# Altium PCB PCB.PcbDoc (part 6 of 7)
Units mm, origin at the board's own origin, x right, y up, seen from the top; angles counter-clockwise.
Board outline 78.8 x 69 mm, 12 copper layers (Top Layer, GND_12, uStrip1, GND_35, Clocks, GND_57, POWER, Slow_Ctrl, GND_810, uStrip2, GND_1012, Bottom Layer), stack 2.926 mm thick; 290 components, 212 nets, 1379 pads, 3418 vias.
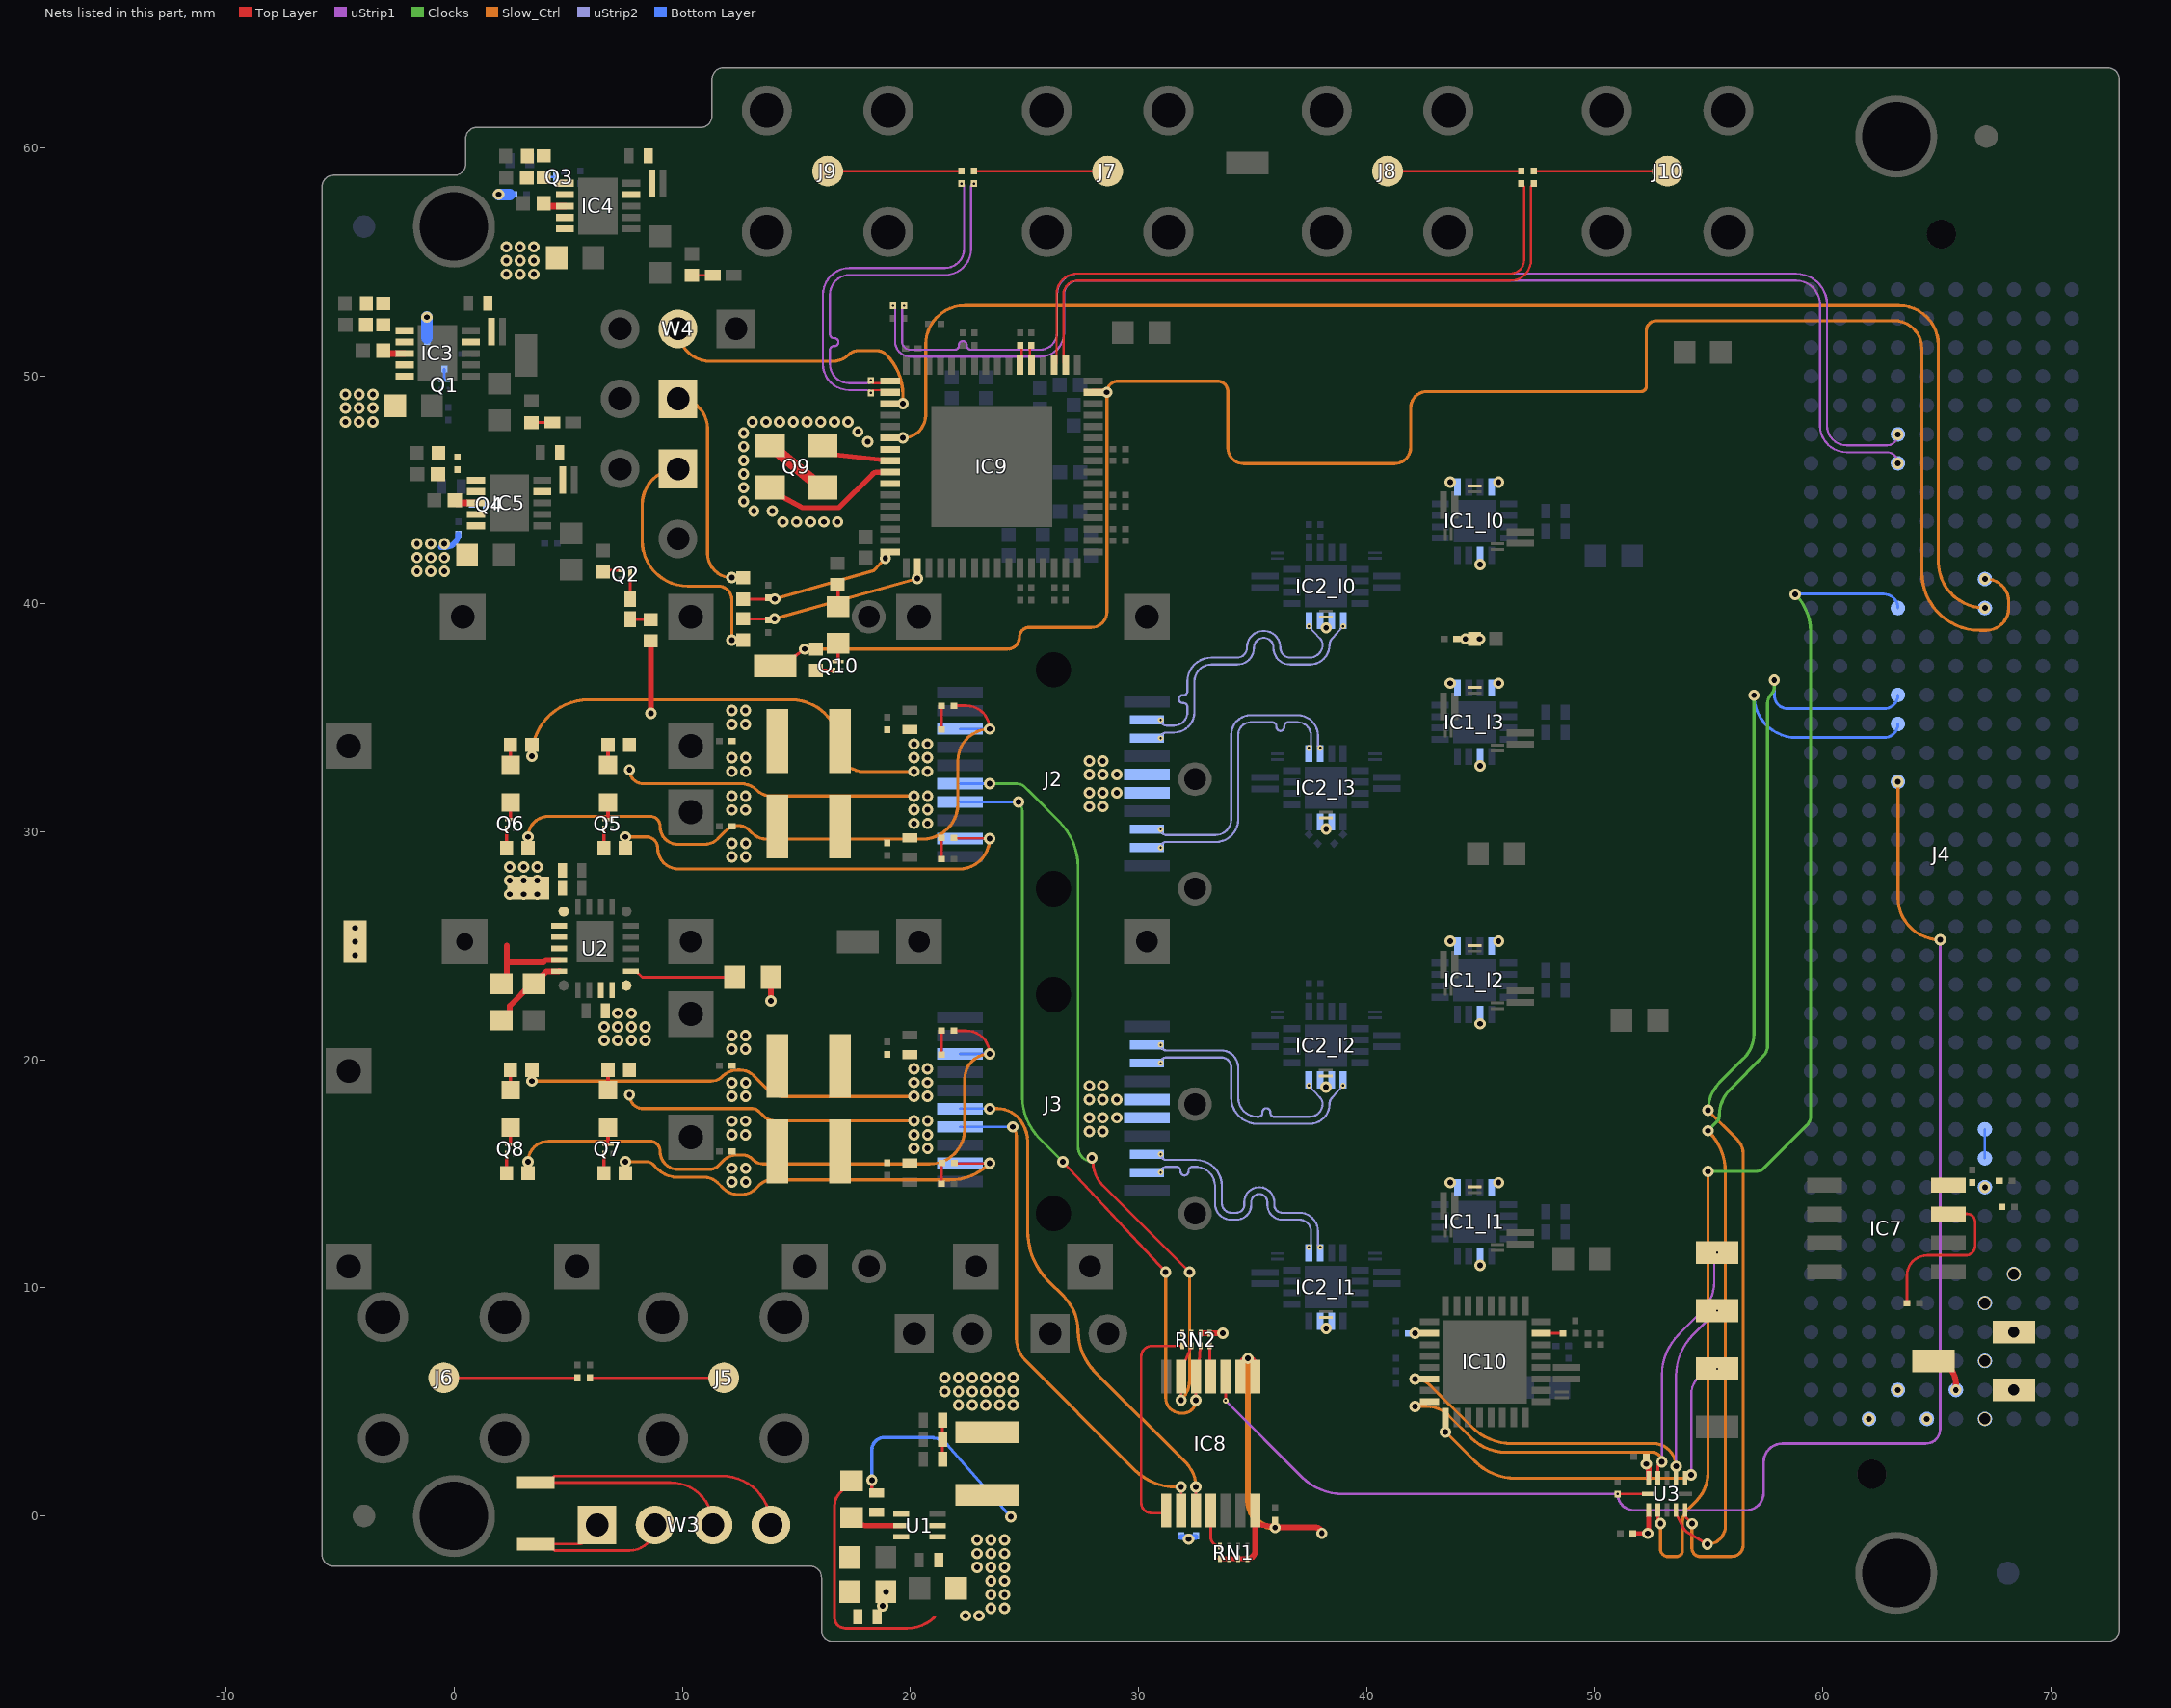
[diagram p15: the nets of this part, all layers, seen from the top]

## Via types
v1: diameter 0.25, hole 0.1, Top Layer to uStrip1, tented both sides, 895 vias
v2: diameter 0.25, hole 0.1, uStrip2 to Bottom Layer, tented both sides, 888 vias
v3: diameter 0.5, hole 0.25, Top Layer to Bottom Layer, tented both sides, 768 vias
v4: diameter 0.5, hole 0.25, Top Layer to Bottom Layer, 545 vias
v5: diameter 0.5, hole 0.25, uStrip1 to uStrip2, tented both sides, 315 vias
v6: diameter 0.584, hole 0.483, Top Layer to Bottom Layer, tented both sides, 6 vias
v7: diameter 0.5, hole 0.25, uStrip1 to uStrip2, 1 vias

## Nets (pads, with @x,y where several pads share a name; then routed paths per layer and width w, separated by ;. In a path a pad name is that pad's centre, name@x,y a point inside that pad or via, vN(x,y) a via of type N, cw(c..) or ccw(c..) an arc to the next point about the centre after c; other vN are vias at no path point) (continued)
IN1_N: C74.1 IC9.2 R50.1 | length 17.1
  Top Layer w0.099: v1(18.269,49.255) cw(c18.392,49.255) 18.392,49.378 19.011,49.378 cw(c19.011,49.28) IC9.2@19.108,49.28
  uStrip1 w0.094: v1(18.269,49.255) ccw(c18.146,49.255) 18.146,49.378 17.315,49.378 cw(c17.315,50.531) 16.162,50.531 16.162,53.561 cw(c17.337,53.561) 17.337,54.735 21.513,54.735 ccw(c21.513,55.578) 22.355,55.578 22.355,58.309 ccw(c22.232,58.309) v1(22.232,58.431)
IN1_P: C71.1 IC9.1 R50.2 | length 17.1
  Top Layer w0.099: v1(18.269,49.805) ccw(c18.392,49.805) 18.392,49.683 19.011,49.683 ccw(c19.011,49.78) IC9.1@19.108,49.78
  uStrip1 w0.094: v1(18.269,49.805) cw(c18.146,49.805) 18.146,49.683 17.315,49.683 cw(c17.315,50.531) 16.467,50.531 16.467,50.738 16.467,51.133 cw(c16.641,51.133) 16.641,51.307 16.669,51.307 ccw(c16.669,51.481) 16.669,51.655 16.641,51.655 cw(c16.641,51.829) 16.467,51.829 16.467,52.283 16.467,53.561 cw(c17.337,53.561) 17.337,54.431 21.513,54.431 ccw(c21.513,55.578) 22.66,55.578 22.66,58.309 cw(c22.782,58.309) v1(22.782,58.431)
LE_3V3: IC10.22 TP13.1 U3.8 | length 20.5
  uStrip1 w0.102: v3(53.569,2.175) 53.569,6.15 cw(c56.109,6.15) 54.313,7.946 v1(55.372,9.005)
  Slow_Ctrl w0.137: v3(42.131,6.013) cw(c42.131,5.118) 42.763,5.751 44.595,3.919 ccw(c46.391,5.715) 46.391,3.175 52.569,3.175 cw(c52.569,2.175) v3(53.569,2.175)
LE_PS: J4.G15 U3.4 | length 48.5
  Top Layer w0.127: U3.4@53.569,0.266 53.606,0.03 53.885,-0.524 ccw(c54.255,-0.338) 54.04,-0.693 v3(54.939,-1.237)
  Clocks w0.137: v3(54.969,16.896) 55.344,17.271 ccw(c55.05,17.565) 55.466,17.565 cw(c57.1,17.565) 55.945,18.72 57.394,20.169 ccw(c56.94,20.623) 57.582,20.623 57.582,35.639 ; 57.582,35.64 cw(c58.16,35.64) 57.751,36.049 ccw(c57.455,36.344) 57.873,36.344 v3(57.873,36.653)
  Slow_Ctrl w0.137: v3(54.939,-1.237) ccw(c54.939,-0.443) 55.734,-0.443 55.734,5.23 55.734,15.079 ccw(c53.194,15.079) 54.99,16.875 v3(54.969,16.896)
  Bottom Layer w0.127: v3(57.873,36.653) 57.873,36.008 ccw(c58.475,36.008) 58.475,35.407 62.694,35.407 ccw(c62.694,36.01) J4.G15@63.297,36.01
NetC12_l0_2: C12_l0.2 IC2_l0.2 IC2_l0.3
  other v3: 38.228,38.953
NetC12_l1_2: C12_l1.2 IC2_l1.2 IC2_l1.3
  other v3: 38.227,8.227
NetC12_l2_2: C12_l2.2 IC2_l2.2 IC2_l2.3
  other v3: 38.218,18.814
NetC12_l3_2: C12_l3.2 IC2_l3.2 IC2_l3.3
  other v3: 38.227,30.128
NetC17_2: C17.2 IC3.7 R5.2
NetC18_2: C18.2 C19.2 IC3.4
NetC20_2: C20.2 IC3.8 | length 1
  Top Layer w0.305: C20.2@-3.116,51.111 -2.958,50.987 IC3.8@-2.182,50.987
NetC22_1: C22.1 L1.1 U1.2 | length 9.9
  Top Layer w0.152: v3(18.309,1.576) 18.309,1.139 C22.1@18.507,1.015
  Bottom Layer w0.117: 21.598,3.131 v3(24.394,-0.034)
  Bottom Layer w0.152: v3(18.309,1.576) 18.309,2.898 cw(c18.853,2.898) 18.853,3.442 20.846,3.442 cw(c20.846,2.379) 21.595,3.134 21.598,3.131
NetC22_2: C22.2 U1.4
NetC29_1: C29.1 R9.2 R10.2 U1.6
NetC30_2: C30.2 IC4.7 R11.2
NetC31_2: C31.2 C32.2 IC4.4
NetC33_2: C33.2 IC4.8 | length 1
  Top Layer w0.305: C33.2@3.917,57.573 4.074,57.449 IC4.8@4.851,57.449
NetC39_2: C39.2 IC5.7 R17.2
NetC40_2: C40.2 C41.2 IC5.4
NetC42_2: C42.2 IC5.8 | length 1
  Top Layer w0.305: C42.2@0.024,44.556 0.182,44.432 IC5.8@0.958,44.432
NetC67_2: C67.2 J5.1 | length 5.9
  Top Layer w0.117: C67.2@5.951,6.062 J5.1@11.814,6.062
NetC68_2: C68.2 J6.1 | length 5.9
  Top Layer w0.117: J6.1@-0.461,6.062 C68.2@5.401,6.062
NetD1_2: D1.2 R3.1 | length 0.9
  Top Layer w0.117: R3.1@3.382,47.956 D1.2@4.303,47.956
NetD2_2: D2.2 R8.1 | length 0.9
  Top Layer w0.117: R8.1@10.415,54.418 D2.2@11.335,54.418
NetD3_1: D3.1 Q2.3 | length 1.1
  Top Layer w0.117: D3.1@7.713,40.224 Q2.3@7.713,41.298
NetD3_2: D3.2 R15.1 | length 0.9
  Top Layer w0.117: D3.2@7.713,39.324 R15.1@8.614,39.324
  Top Layer w0.254: R15.1@8.614,39.316 R15.1@8.614,39.324
NetD4_1: D4.1 Q10.3 | length 0.8
  Top Layer w0.152: Q10.3@16.821,37.481 D4.1@16.821,38.234
NetD4_2: D4.2 R57.1 | length 1
  Top Layer w0.152: R57.1@16.799,40.842 16.821,40.819 D4.2@16.821,39.878
NetIC3_6: IC3.6 R5.1 R6.2
NetIC4_6: IC4.6 R11.1 R12.2
NetIC5_6: IC5.6 R17.1 R19.2
NetIC6_1: IC6.1 W3.1 W3.2 | length 9.1
  Top Layer w0.117: W3.1@6.26,-0.392 cw(c5.421,-0.392) 5.421,-1.23 IC6.1@3.566,-1.23 4.333,-1.447 4.396,-1.511 7.681,-1.511 ccw(c7.681,-0.392) W3.2@8.8,-0.392
NetIC6_2: IC6.2 W3.3 W3.4 | length 20.4
  Top Layer w0.117: W3.3@11.34,-0.392 ccw(c9.478,-0.392) 9.478,1.47 IC6.2@3.566,1.47 4.333,1.686 4.396,1.75 11.738,1.75 cw(c11.738,-0.392) W3.4@13.88,-0.392
NetIC7_7: IC7.7 R46.2 | length 7.4
  Top Layer w0.117: R46.2@63.695,9.332 63.695,10.552 cw(c64.575,10.552) 64.575,11.431 66.265,11.431 ccw(c66.265,11.845) 66.679,11.845 66.679,12.9 ccw(c66.331,12.9) 66.331,13.248 IC7.7@65.503,13.248 ; R46.2@63.778,9.333 R46.2@63.781,9.333
NetIC8_4: IC8.4 RN2.8 | length 1.4
  Top Layer w0.117: RN2.8@33.117,7.458 33.12,7.371 33.12,6.783 IC8.4@33.167,6.109
NetIC8_8: IC8.8 RN2.5 | length 9.9
  Top Layer w0.117: IC8.8@31.217,0.233 31.055,0.126 30.586,0.126 cw(c30.586,0.598) 30.115,0.598 30.115,6.981 cw(c30.591,6.981) 30.591,7.457 31.893,7.457 RN2.5@31.917,7.458
NetIC8_11: IC8.11 RN1.4 | length 1.8
  Top Layer w0.117: IC8.11@33.167,0.233 33.167,-0.922 ccw(c33.567,-0.922) RN1.4@33.567,-1.323
NetIC9_3: IC9.3 W4.2 | length 12.5
  Slow_Ctrl w0.137: W4.2@9.808,52.063 ccw(c11.227,52.063) 11.227,50.644 16.58,50.644 ccw(c16.58,51.679) 17.312,50.947 cw(c17.703,50.556) 17.703,51.109 18.529,51.109 cw(c18.529,50.537) 18.934,50.941 cw(c17.163,49.171) 19.667,49.171 v3(19.667,48.78)
NetIC9_8: IC9.8 Q9.1 | length 3.1
  Top Layer w0.229: Q9.1@16.146,46.955 16.682,46.545 18.798,46.316 IC9.8@19.108,46.28
NetIC9_9: IC9.9 Q9.3 | length 6.1
  Top Layer w0.229: Q9.3@13.846,45.105 14.369,44.707 15.267,44.224 16.86,44.224 18.356,45.707 cw(c18.528,45.52) 18.528,45.774 18.81,45.774 IC9.9@19.108,45.78
NetIC9_16: IC9.16 R53.1 R55.2 | length 6.4
  Top Layer w0.127: R55.2@12.665,40.213 13.713,40.213 R53.1@13.768,40.268
  Slow_Ctrl w0.137: v3(14.052,40.218) 18.387,41.464 v3(18.899,42.005)
NetIC9_18: IC9.18 R54.1 R56.2 | length 7.6
  Top Layer w0.127: R56.2@12.665,39.353 13.712,39.353 R54.1@13.767,39.298
  Slow_Ctrl w0.137: v3(14.04,39.353) v3(20.308,41.122)
NetIC10_7: IC10.7 R61X.1 | length 0.9
  Top Layer w0.117: IC10.7@47.654,8.013 R61X.1@48.603,8.013
NetIC10_18: IC10.18 R62X.2
  other v3: 42.131,8.013
NetJ4_D30: J4.D30 J4.D31 | length 1.3
  Bottom Layer w0.117: J4.D31@67.107,15.69 J4.D30@67.107,16.96
NetLED1_1: LED1.1 Q5.3 | length 0.7
  Top Layer w0.152: Q5.3@6.74,30.547 LED1.1@6.74,31.29
NetLED1_2: LED1.2 R28.1 | length 0.9
  Top Layer w0.152: LED1.2@6.74,32.941 R28.1@6.74,33.819
NetLED2_1: LED2.1 Q6.3 | length 0.7
  Top Layer w0.152: 2.467,30.639 LED2.1@2.467,31.29
NetLED2_2: LED2.2 R29.1 | length 0.9
  Top Layer w0.152: LED2.2@2.467,32.941 R29.1@2.467,33.819
NetLED3_1: LED3.1 Q7.3 | length 0.7
  Top Layer w0.152: Q7.3@6.74,16.297 LED3.1@6.74,17.039
NetLED3_2: LED3.2 R36.1 | length 0.9
  Top Layer w0.152: LED3.2@6.74,18.69 R36.1@6.74,19.569
NetLED4_1: LED4.1 Q8.3 | length 0.7
  Top Layer w0.152: Q8.3@2.467,16.297 LED4.1@2.467,17.039
NetLED4_2: LED4.2 R37.1 | length 0.9
  Top Layer w0.152: LED4.2@2.467,18.69 R37.1@2.467,19.569
NetQ1_3: Q1.3 R2.1 | length 0.5
  Bottom Layer w0.117: Q1.3@-0.438,49.804 R2.1@-0.438,50.301
NetQ2_1: Q2.1 R18.2 | length 0.8
  Top Layer w0.117: R18.2@6.616,41.34 6.616,41.473 Q2.1@7.313,41.473
NetQ3_3: Q3.3 R22.1 | length 0.5
  Bottom Layer w0.117: R22.1@3.834,58.723 Q3.3@4.331,58.723
NetQ4_3: Q4.3 R26.1 | length 0.5
  Bottom Layer w0.117: R26.1@0.831,44.365 Q4.3@1.328,44.365
NetQ5_1: Q5.1 R33.2 | length 0.9
  Top Layer w0.152: R33.2@6.565,29.287 Q5.1@6.565,30.147
NetQ6_1: Q6.1 R34.2 | length 0.9
  Top Layer w0.152: R34.2@2.292,29.287 Q6.1@2.292,30.147
NetQ7_1: Q7.1 R41.2 | length 0.9
  Top Layer w0.152: R41.2@6.565,15.037 Q7.1@6.565,15.897
NetQ8_1: Q8.1 R42.2 | length 0.9
  Top Layer w0.152: R42.2@2.292,15.037 Q8.1@2.292,15.897
NetQ10_1: Q10.1 R58.2 | length 0.8
  Top Layer w0.152: R58.2@15.86,37.081 Q10.1@16.646,37.081
NetR7_1: R7.1 U1.5 | length 2.3
  Top Layer w0.229: R7.1@17.421,-0.064 17.615,-0.259 ccw(c18.004,0.13) 18.004,-0.419 U1.5@19.594,-0.419
NetR13_1: R13.1 U2.2 | length 4.6
  Top Layer w0.117: U2.2@7.747,23.89 7.972,23.89 8.24,23.622 R13.1@12.281,23.622
NetR14_1: R14.1 R16.2 U2.17 | length 3.6
  Top Layer w0.254: R14.1@2.056,21.742 2.106,21.742 2.429,22.065 2.429,22.373 3.397,23.342 3.447,23.342 R16.2@3.497,23.342 4.044,23.888 4.595,23.888 U2.17@4.597,23.89
NetR55_1: R55.1 W5.1 | length 9.2
  Slow_Ctrl w0.137: W5.1@9.808,48.994 cw(c9.808,47.697) 11.105,47.697 11.105,42.215 ccw(c12.167,42.215) v3(12.167,41.153)
NetR56_1: R56.1 W6.1 | length 11.2
  Slow_Ctrl w0.137: W6.1@9.808,45.925 ccw(c9.808,44.355) 8.238,44.355 8.238,42.778 ccw(c10.233,42.778) 10.233,40.783 11.575,40.783 cw(c11.572,40.188) 12.167,40.188 v3(12.167,38.413)
OE_LS: IC8.3 J4.G18 R47.2 U3.12 | length 67.8
  Top Layer w0.117: v1(33.817,5.062) IC8.3@33.817,6.109 ; v1(51.009,0.966) U3.12@52.369,0.966
  uStrip1 w0.117: v1(33.817,5.062) 37.168,1.71 ccw(c38.965,3.506) 38.965,0.966 v1(51.009,0.966) ccw(c51.721,0.966) 51.721,0.254 56.642,0.254 ccw(c56.642,1.016) 57.404,1.016 57.404,2.349 cw(c58.229,2.349) 58.229,3.175 64.516,3.175 ccw(c64.516,3.81) 65.151,3.81 v7(65.151,25.273)
  Slow_Ctrl w0.137: v4(63.298,32.2) 63.298,27.126 ccw(c65.151,27.126) v7(65.151,25.273)
P2V05: C34.2 C35.2 C37.2 IC5.9 IC5.10 R14.2 R25.1 TP4.1 U2.12 U2.13 U2.14 U2.15 U2.16 | length 5.2
  Top Layer w0.254: R14.2@2.056,23.342 2.295,23.581 2.295,24.274 ; 2.295,25.017 2.295,24.274 ; U2.16@4.597,24.39 4.595,24.388 4.013,24.388 3.899,24.274 2.295,24.274
  Bottom Layer w0.254: v4@-0.591,42.496 -0.389,42.496 ccw(c-0.389,43.055) R25.1@0.171,43.055
  other v4: 2.438,27.269 3.038,27.269 3.638,27.269 2.438,27.869 3.038,27.869 3.638,27.869 2.438,28.469 3.038,28.469 3.638,28.469 -1.634,41.434 -1.034,41.434 -0.434,41.434 -1.634,42.034 -1.034,42.034 -0.434,42.034 -1.634,42.634 -1.034,42.634 -0.434,42.634
P3V3: C36.2 C47.2 C50.2 C53.2 C56.2 C107.2 J4.C39 J4.D36 J4.D38 J4.D40 L2.2 L3.2 L4.2 L5.2 R13.2 R15.2 R48.1 R49.1 RN2.1 RN2.2 RN2.3 RN2.4 TP7.1 U2.1 U2.21 U2.22 U3.11 | length 6.5
  Top Layer w0.254: R15.2@8.614,38.376 8.618,38.372 8.618,35.206 v3(8.622,35.202) ; v4(13.881,22.591) R13.2@13.881,23.622 ; RN2.2@32.717,8.008 RN2.1@33.117,8.008 v4(33.7,8.008) ; v3(52.269,2.28) cw(c52.269,2.18) 52.369,2.18 U3.11@52.369,1.666
  Bottom Layer w0.254: R48.1@31.867,-0.922 R49.1@32.517,-0.922
  other v3: 32.193,-1.017
  other v4: 12.174,14.65 12.774,14.65 12.174,15.25 12.774,15.25 12.169,16.718 12.769,16.718 12.169,17.318 12.769,17.318 12.174,18.404 12.774,18.404 12.174,19.004 12.774,19.004 12.169,20.472 12.769,20.472 6.566,20.851 7.166,20.851 7.766,20.851 8.366,20.851 12.169,21.072 12.769,21.072 6.566,21.451 7.166,21.451 7.766,21.451 8.366,21.451 7.166,22.051 7.766,22.051 12.174,28.9 12.774,28.9 12.174,29.5 12.774,29.5 12.169,30.968 12.769,30.968 12.169,31.568 12.769,31.568 12.174,32.654 12.774,32.654 12.174,33.254 12.774,33.254 12.169,34.722 12.769,34.722 12.169,35.322 12.769,35.322
  other v6: 67.108,4.26 68.378,5.53 67.108,6.8 67.108,9.34
P3V3A: C65.2 IC7.8 J4.D32 R44.2 R45.2 | length 0
  Top Layer w0.117: R44.2@66.552,14.626 R44.2@66.552,14.632
  other v3: 67.108,14.42
P3V6: C15.2 C23.1 C24.2 C25.2 C27.2 C29.2 IC3.9 IC3.10 IC4.9 IC4.10 L1.2 R1.1 R9.1 R21.1 TP2.1 | length 3.1
  Top Layer w0.127: C23.1@21.41,2.489 C24.2@21.41,3.343 C25.2@21.41,4.197
  Bottom Layer w0.508: -1.198,51.661 v3(-1.198,52.578) ; v3(1.945,57.963) 2.429,57.963
  other v4: 18.788,-3.941 18.922,-3.326 22.108,4.865 22.708,4.865 23.308,4.865 23.908,4.865 24.508,4.865 21.508,5.465 22.108,5.465 22.708,5.465 23.308,5.465 23.908,5.465 24.508,5.465 21.508,6.065 22.108,6.065 22.708,6.065 23.308,6.065 23.908,6.065 24.508,6.065 -4.349,24.59 -4.349,25.19 -4.349,25.79 -4.774,47.989 -4.174,47.989 -3.574,47.989 -4.774,48.589 -4.174,48.589 -3.574,48.589 -4.774,49.189 -4.174,49.189 -3.574,49.189 2.285,54.46 2.885,54.46 3.485,54.46 2.285,55.06 2.885,55.06 3.485,55.06 2.285,55.66 2.885,55.66 3.485,55.66
P12V: C21.1 C26.2 J4.C35 J4.C37 R7.2 TP6.1 U1.1 | length 11.1
  Top Layer w0.127: 16.671,-2.463 16.671,-4.485 ccw(c17.139,-4.46) 17.139,-4.929 19.861,-4.929 ccw(c19.861,-3.239) 21.056,-4.434 ; 16.671,-2.463 16.671,0.459 cw(c17.459,0.459) 16.902,1.016 R7.2@17.421,1.536
  other v4: 22.411,-4.376 23.011,-4.376 23.524,-4.049 24.124,-4.049 23.524,-3.449 24.124,-3.449 23.524,-2.849 24.124,-2.849 22.924,-2.249 23.524,-2.249 24.124,-2.249 22.924,-1.649 23.524,-1.649 24.124,-1.649 22.924,-1.049 23.524,-1.049 24.124,-1.049
  other v6: 68.378,8.07 68.378,10.61
PLL_IN_AUX_N: C74.2 J9.1 | length 5.9
  Top Layer w0.117: J9.1@16.37,58.981 C74.2@22.232,58.981
PLL_IN_AUX_P: C71.2 J7.1 | length 5.9
  Top Layer w0.117: C71.2@22.782,58.981 J7.1@28.645,58.981
PLL_Lock: IC9.47 J4.D11 R58.1 TP9.1 | length 88.6
  Top Layer w0.137: TP9.1@14.073,37.285 14.929,37.716 v3(15.362,38.021)
  Top Layer w0.3: IC9.47@28.008,49.28 v3(28.613,49.28)
  Slow_Ctrl w0.137: v3(15.362,38.021) 24.258,38.021 ccw(c24.258,38.539) 24.776,38.539 cw(c25.213,38.539) 25.213,38.976 27.934,38.976 ccw(c27.934,39.655) 28.613,39.655 v3(28.613,49.28) cw(c29.102,49.28) 29.102,49.77 33.46,49.77 cw(c33.46,49.31) 33.919,49.31 33.919,46.842 ccw(c34.604,46.842) 34.604,46.158 41.224,46.158 ccw(c41.224,46.868) 41.935,46.868 41.935,48.598 cw(c42.654,48.598) 42.654,49.317 52.041,49.317 ccw(c52.041,49.545) 52.269,49.545 52.269,51.99 cw(c52.701,51.99) 52.701,52.422 63.131,52.422 cw(c63.131,51.208) 64.344,51.208 64.344,41.386 ccw(c66.884,41.386) 66.884,38.846 67.177,38.846 ccw(c67.177,39.823) 68.153,39.823 68.153,40.102 ccw(c67.165,40.102) 67.165,41.09 v3(67.108,41.09)
PLL_OUT_N: C70.1 IC9.53 | length 1
  Top Layer w0.099: IC9.53@25.308,50.48 cw(c25.308,50.553) 25.236,50.553 25.236,51.276 cw(c25.308,51.276) C70.1@25.308,51.348
PLL_OUT_P: C69.1 IC9.54 | length 1
  Top Layer w0.099: IC9.54@24.808,50.48 ccw(c24.808,50.553) 24.881,50.553 24.881,51.276 ccw(c24.809,51.276) C69.1@24.809,51.348
PLL_OUTA_N: C76.1 IC9.50 | length 27.7
  Top Layer w0.099: IC9.50@26.736,50.553 26.711,50.578 26.711,53.584 cw(c27.308,53.584) 27.308,54.181 46.308,54.181 ccw(c46.308,55.083) 47.21,55.083 47.21,58.309 C76.1@47.234,58.333
PLL_OUTA_P: C73.1 IC9.51 | length 27.7
  Top Layer w0.099: IC9.51@26.381,50.553 26.406,50.578 26.406,53.584 cw(c27.308,53.584) 27.308,54.486 46.308,54.486 ccw(c46.308,55.083) 46.905,55.083 46.905,58.309 C73.1@46.88,58.333
PLL_RSTb: IC9.6 J4.D12 | length 63.7
  Slow_Ctrl w0.137: v3(19.667,47.28) ccw(c19.667,48.282) 20.668,48.282 20.668,51.379 cw(c22.374,51.379) 22.374,53.084 63.347,53.084 cw(c63.347,51.361) 65.07,51.361 65.07,41.858 ccw(c67.108,41.858) v3(67.108,39.82)
PLL_SMA_OUT_N: C76.2 J10.1 | length 5.9
  Top Layer w0.117: C76.2@47.332,58.981 J10.1@53.195,58.981
PLL_SMA_OUT_P: C73.2 J8.1 | length 5.9
  Top Layer w0.117: J8.1@40.92,58.981 C73.2@46.782,58.981
RXUSRCLK_N: C79.2 J4.G7 | length 55.4
  uStrip1 w0.094: v1(19.233,53.072) cw(c19.233,52.978) 19.328,52.978 19.328,51.513 ccw(c19.996,51.513) 19.996,50.845 25.685,50.845 ccw(c25.685,51.893) 26.733,51.893 26.733,53.563 cw(c27.351,53.563) 27.351,54.181 58.836,54.181 cw(c58.836,53.136) 59.881,53.136 59.881,47.824 ccw(c61.053,47.824) 61.053,46.653 62.815,46.653 cw(c62.815,46.17) v2(63.298,46.17)
  other v5: 63.298,46.17
RXUSRCLK_P: C77.2 J4.G6 | length 55.4
  uStrip1 w0.094: v1(19.727,53.075) ccw(c19.727,52.98) 19.633,52.98 19.633,51.513 ccw(c19.996,51.513) 19.996,51.15 21.551,51.15 21.951,51.15 ccw(c21.951,51.324) 22.125,51.324 22.125,51.354 cw(c22.298,51.354) 22.472,51.354 22.472,51.324 ccw(c22.646,51.324) 22.646,51.15 23.041,51.15 25.685,51.15 ccw(c25.685,51.893) 26.429,51.893 26.429,53.563 cw(c27.351,53.563) 27.351,54.485 58.836,54.485 cw(c58.836,53.136) 60.186,53.136 60.186,47.824 ccw(c61.053,47.824) 61.053,46.957 62.815,46.957 ccw(c62.815,47.44) v5(63.298,47.44)
  other v2: 63.298,47.44
S_IN_PS: J4.G12 U3.2 | length 53.8
  Top Layer w0.117: U3.2@52.733,0.03 U3.2@52.769,0.266 52.769,-0.218 ccw(c52.886,-0.218) v3(52.886,-0.335)
  Clocks w0.137: v3(54.969,15.11) 54.971,15.112 57.066,15.112 ccw(c57.066,15.622) 57.427,15.261 59.309,17.143 ccw(c58.913,17.539) 59.473,17.539 59.473,38.787 ccw(c57.161,38.787) v3(58.796,40.422)
  Slow_Ctrl w0.137: v3(52.886,-0.335) 52.886,-1.451 ccw(c53.213,-1.451) 53.213,-1.778 53.594,-1.778 ccw(c53.594,-1.524) 53.848,-1.524 53.848,-0.401 ccw(c53.711,-0.401) 53.847,-0.385 cw(c54.265,-0.338) 53.846,-0.305 53.848,-0.279 ccw(c53.711,-0.268) 53.848,-0.268 cw(c54.621,-0.268) 54.074,0.278 54.447,0.65 ccw(c53.185,1.912) 54.969,1.912 54.969,2.09 cw(c55.106,2.089) 54.969,2.095 ccw(c53.511,2.159) 54.971,2.159 54.971,2.308 ccw(c53.87,2.308) 54.969,2.363 cw(c55.106,2.369) 54.969,2.368 v3(54.969,15.11)
  Bottom Layer w0.127: v3(58.796,40.422) 58.805,40.431 62.686,40.431 cw(c62.686,39.82) J4.G12@63.297,39.82
SCL0: IC8.6 J2.5 RN2.6 | length 35.3
  Top Layer w0.117: v4@28.003,15.537 ccw(c29.459,15.537) 28.429,14.508 v3(32.239,10.698) ; v3(31.867,5.073) IC8.6@31.867,6.109 32.028,6.783 32.293,7.371 RN2.6@32.317,7.458
  Clocks w0.117: v3(23.471,32.115) 24.319,32.115 24.667,32.115 cw(c24.667,31.625) 25.013,31.972 25.259,31.726 26.515,30.47 cw(c24.495,28.457) 27.346,28.457 27.346,16.193 ccw(c28.003,16.193) v4@28.003,15.537
  Slow_Ctrl w0.137: v3(31.867,5.073) ccw(c30.968,5.972) 32.239,5.972 v3(32.239,10.698)
  Bottom Layer w0.117: J2.5@22.171,32.115 v3(23.471,32.115)
  other v4: 27.958,15.707
SCL1: IC8.10 J3.5 R49.2 | length 24.2
  Top Layer w0.137: IC8.10@32.517,0.233 v3(32.517,1.269)
  Slow_Ctrl w0.137: v3(23.471,17.865) 23.816,17.865 cw(c23.816,16.628) 24.691,17.503 cw(c23.613,16.424) 25.138,16.424 25.138,12.462 25.148,12.296 ccw(c28.227,12.484) 26.046,10.303 ; 26.046,10.302 26.727,9.621 cw(c25.216,8.111) 27.352,8.111 ccw(c29.892,8.111) 28.096,6.315 32.074,2.337 cw(c31.006,1.269) v3(32.517,1.269)
  Bottom Layer w0.117: J3.5@22.171,17.865 v3(23.471,17.865)
  Bottom Layer w0.137: R49.2@32.517,-0.317 v3(32.517,1.269)
SDA0: IC8.5 J2.4 RN2.7 | length 35.6
  Top Layer w0.117: v3(26.683,15.537) v3(31.19,10.702) ; v3(32.517,5.073) IC8.5@32.517,6.109 32.666,6.77 32.706,7.384 RN2.7@32.717,7.458
  Clocks w0.117: v3(24.741,31.315) cw(c24.341,30.915) 24.907,30.915 24.907,18.365 ccw(c27.447,18.365) 25.651,16.569 v3(26.683,15.537)
  Slow_Ctrl w0.137: v3(31.19,10.702) 31.19,5.189 ccw(c31.867,5.189) 31.867,4.512 31.957,4.512 ccw(c31.957,5.073) v3(32.517,5.073)
  Bottom Layer w0.117: J2.4@22.171,31.315 v3(24.741,31.315)
SDA1: IC8.9 J3.4 R48.2 | length 24.3
  Top Layer w0.117: IC8.9@31.867,0.233 v3(31.867,1.269)
  Slow_Ctrl w0.137: v3(24.487,17.065) cw(c24.112,16.689) 24.643,16.689 24.643,7.804 ccw(c26.071,7.804) 25.061,6.794 29.616,2.239 29.843,2.013 ccw(c31.639,3.809) 31.639,1.269 v3(31.867,1.269)
  Bottom Layer w0.117: J3.4@22.171,17.065 v3(24.487,17.065) ; R48.2@31.867,-0.317 v3(31.867,1.269)
SDO2_3V3: IC10.25 TP10.1 U3.7 | length 16.9
  uStrip1 w0.102: v3(54.234,1.803) 54.234,5.315 cw(c55.372,5.315) v1(55.372,6.453)
  Slow_Ctrl w0.137: v3(43.454,3.689) 44.749,2.395 ccw(c46.545,4.191) 46.545,1.651 53.868,1.651 ccw(c53.868,2.168) v3(54.234,1.803)
SDO_PS: J4.G16 U3.5 | length 50.8
  Top Layer w0.117: U3.5@53.969,0.266 54.011,0.025 54.011,-0.084 v3(54.265,-0.338)
  Clocks w0.137: v3(54.969,17.789) cw(c56.684,17.789) 55.471,19.001 56.528,20.058 ccw(c55.42,21.166) 56.987,21.166 v3(56.987,35.993)
  Slow_Ctrl w0.137: v3(54.265,-0.338) 54.265,-1.415 ccw(c54.627,-1.415) 54.627,-1.778 56.007,-1.778 ccw(c56.007,-1.277) 56.508,-1.277 56.508,15.879 ccw(c55.614,15.879) 56.246,16.511 v3(54.969,17.789)
  Bottom Layer w0.127: v3(56.987,35.993) ccw(c58.841,35.993) 58.841,34.139 62.697,34.139 ccw(c62.697,34.74) J4.G16@63.297,34.74
SFP0_FAULT: J2.2 R31.1 R33.1 | length 20.4
  Top Layer w0.117: R31.1@21.959,29.738 ccw(c21.982,29.738) 21.982,29.715 v3(23.471,29.715)
  Slow_Ctrl w0.137: v3(7.505,29.785) 8.431,29.785 cw(c8.431,29.302) 8.914,29.302 ccw(c9.841,29.302) 9.841,28.375 22.131,28.375 ccw(c22.131,29.715) v3(23.471,29.715)
  Bottom Layer w0.117: J2.2@22.171,29.715 v3(23.471,29.715)
SFP0_LOS: J2.8 R32.1 R34.1 | length 28.9
  Top Layer w0.117: R32.1@21.904,35.535 22.452,35.535 cw(c22.452,34.515) v3(23.471,34.515)
  Slow_Ctrl w0.137: v3(3.232,29.785) cw(c4.131,29.785) 4.131,30.684 8.582,30.684 cw(c8.582,30.24) 9.025,30.24 ccw(c9.813,30.24) 9.813,29.452 10.95,29.452 ccw(c10.95,30.304) 11.552,29.702 11.892,30.042 cw(c12.457,29.478) 12.457,30.276 cw(c12.457,29.612) 12.926,30.081 13.053,29.955 ccw(c13.695,30.597) 13.695,29.688 20.54,29.688 ccw(c20.54,31.228) 22.079,31.228 22.079,33.119 cw(c23.475,33.119) v3@23.475,34.515
  Bottom Layer w0.117: J2.8@22.171,34.515 v3(23.471,34.515)
SFP1_FAULT: J3.2 R39.1 R41.1 | length 19.6
  Top Layer w0.117: R39.1@21.959,15.488 ccw(c21.982,15.488) 21.982,15.465 v3(23.471,15.465)
  Slow_Ctrl w0.137: v3(7.505,15.535) 8.431,15.535 cw(c8.431,15.138) 8.712,15.418 8.912,15.218 ccw(c9.779,16.085) 9.779,14.859 10.944,14.859 cw(c10.944,13.992) 11.557,14.605 11.796,14.366 ccw(c12.446,15.017) 12.446,14.097 12.595,14.097 ccw(c12.595,14.964) 13.208,14.351 13.357,14.5 cw(c13.937,13.919) 13.937,14.74 21.721,14.74 ccw(c21.721,17.215) v3(23.471,15.465)
  Bottom Layer w0.117: J3.2@22.171,15.465 v3(23.471,15.465)
SFP1_LOS: J3.8 R40.1 R42.1 | length 28.9
  Top Layer w0.117: R40.1@21.904,21.285 22.452,21.285 cw(c22.452,20.265) v3(23.471,20.265)
  Slow_Ctrl w0.137: v3(3.232,15.535) cw(c4.131,15.535) 4.131,16.434 8.582,16.434 cw(c8.582,15.99) 9.025,15.99 ccw(c9.813,15.99) 9.813,15.202 11.175,15.202 ccw(c11.175,15.789) 11.59,15.374 11.841,15.625 ; 11.841,15.625 cw(c12.326,15.139) 12.326,15.826 12.676,15.826 cw(c12.676,15.309) 13.041,15.675 13.093,15.622 ccw(c13.537,16.066) 13.537,15.438 20.84,15.438 ccw(c20.84,16.978) 22.379,16.978 22.379,19.173 cw(c23.471,19.173) v3(23.471,20.265)
  Bottom Layer w0.117: J3.8@22.171,20.265 v3(23.471,20.265)
SFP_RX0_N: IC2_l0.4 J2.12 | length 12.7
  uStrip2 w0.094: v2(30.972,34.915) ccw(c31.22,34.915) 31.22,34.667 31.557,34.667 ccw(c31.557,35.257) 32.146,35.257 32.146,35.431 32.146,35.478 ccw(c31.972,35.478) 31.972,35.652 31.945,35.652 cw(c31.945,35.826) 31.945,36 31.972,36 ccw(c31.972,36.174) 32.146,36.174 32.146,36.551 32.146,36.604 cw(c33.191,36.604) 33.191,37.649 34.127,37.649 34.326,37.649 ccw(c34.326,38.077) 34.754,38.077 34.754,38.088 cw(c35.487,38.088) 36.22,38.088 36.22,38.077 ccw(c36.648,38.077) 36.648,37.649 37.502,37.649 ccw(c37.502,38.218) 38.071,38.218 ccw(c37.683,38.218) 37.957,38.492 v2(37.469,39.019)
SFP_RX0_P: IC2_l0.1 J2.13 | length 12.7
  uStrip2 w0.094: v2(30.972,34.115) cw(c31.22,34.115) 31.22,34.363 31.557,34.363 ccw(c31.557,35.257) 32.451,35.257 32.451,36.604 cw(c33.191,36.604) 33.191,37.344 34.127,37.344 34.326,37.344 ccw(c34.326,38.077) 35.059,38.077 35.059,38.088 cw(c35.487,38.088) 35.915,38.088 35.915,38.077 ccw(c36.648,38.077) 36.648,37.344 37.502,37.344 37.516,37.344 ccw(c37.516,38.204) 38.375,38.204 cw(c38.778,38.204) 38.493,38.489 38.497,38.492 v2(38.969,39.019)
SFP_RX1_N: IC2_l2.4 J3.12 | length 11.3
  uStrip2 w0.094: v2(30.972,20.665) ccw(c31.22,20.665) 31.22,20.417 33.623,20.417 cw(c33.623,19.669) 34.372,19.669 34.372,18.348 ccw(c35.211,18.348) 35.211,17.508 35.258,17.508 ccw(c35.258,17.682) 35.432,17.682 35.432,17.709 cw(c35.606,17.709) 35.78,17.709 35.78,17.682 ccw(c35.954,17.682) 35.954,17.508 37.265,17.508 37.5,17.508 ccw(c37.5,18.078) 38.069,18.078 ccw(c37.681,18.078) 37.956,18.352 v2(37.468,18.878)
SFP_RX1_P: IC2_l2.1 J3.13 | length 11.3
  uStrip2 w0.094: v2(30.972,19.865) cw(c31.22,19.865) 31.22,20.113 33.623,20.113 cw(c33.623,19.669) 34.067,19.669 34.067,18.348 ccw(c35.211,18.348) 35.211,17.204 37.513,17.204 ccw(c37.513,18.064) 38.374,18.064 cw(c38.777,18.064) 38.492,18.349 38.495,18.352 v2(38.968,18.878)
SFP_TX0_N: IC2_l3.9 J2.19 | length 12.7
  uStrip2 w0.094: v2(30.972,29.315) cw(c31.22,29.315) 31.22,29.563 33.379,29.563 ccw(c33.379,30.555) 34.372,30.555 34.372,34.275 cw(c34.907,34.275) 34.907,34.81 35.476,34.81 35.871,34.81 cw(c35.871,34.636) 36.045,34.636 36.045,34.608 ccw(c36.219,34.608) 36.393,34.608 36.393,34.636 cw(c36.567,34.636) 36.567,34.81 36.948,34.81 36.976,34.81 ; 36.977,34.81 cw(c36.976,34.221) 37.565,34.221 37.565,33.785 cw(c37.468,33.785) v2(37.468,33.687)
SFP_TX0_P: IC2_l3.10 J2.18 | length 12.7
  uStrip2 w0.094: v2(30.972,30.115) ccw(c31.22,30.115) 31.22,29.867 33.379,29.867 ccw(c33.379,30.555) 34.067,30.555 34.067,34.275 cw(c34.907,34.275) 34.907,35.115 36.976,35.115 cw(c36.976,34.221) 37.87,34.221 37.87,33.785 ccw(c37.968,33.785) v2(37.968,33.687)
SFP_TX1_N: IC2_l1.9 J3.19 | length 11.3
  uStrip2 w0.094: v2(30.972,15.065) cw(c31.22,15.065) 31.22,15.313 31.273,15.313 31.668,15.313 cw(c31.668,15.139) 31.842,15.139 31.842,15.111 ccw(c32.016,15.111) 32.19,15.111 32.19,15.139 cw(c32.364,15.139) 32.364,15.313 32.508,15.313 32.549,15.312 cw(c32.508,14.469) 32.593,15.308 cw(c32.508,14.469) 32.596,15.308 cw(c32.508,14.469) 32.598,15.308 cw(c32.508,14.469) 33.352,14.469 33.352,13.71 ccw(c34.067,13.71) 34.067,12.995 34.087,12.995 34.286,12.995 ccw(c34.286,13.652) 34.943,13.652 34.943,13.763 cw(c35.295,13.763) 35.647,13.763 35.647,13.652 ccw(c36.303,13.652) 36.303,12.995 37.016,12.995 37.051,12.995 cw(c37.051,12.481) 37.565,12.481 37.565,11.884 cw(c37.468,11.884) v2(37.468,11.786)
SFP_TX1_P: IC2_l1.10 J3.18 | length 11.3
  uStrip2 w0.094: v2(30.972,15.865) ccw(c31.22,15.865) 31.22,15.617 32.508,15.617 cw(c32.508,14.469) 33.657,14.469 33.657,13.71 ccw(c34.067,13.71) 34.067,13.3 34.087,13.3 34.286,13.3 ccw(c34.286,13.652) 34.638,13.652 34.638,13.763 cw(c35.295,13.763) 35.951,13.763 35.951,13.652 ccw(c36.303,13.652) 36.303,13.3 37.016,13.3 37.051,13.3 cw(c37.051,12.481) 37.87,12.481 37.87,11.884 ccw(c37.968,11.884) v2(37.968,11.786)
SI_3V3: IC10.24 TP11.1 U3.10 | length 23.2
  Top Layer w0.117: v3(42.131,4.81) 42.38,4.914 IC10.24@42.754,5.013 ; U3.10@52.769,1.666 52.769,2.188 cw(c52.949,2.188) v3(52.949,2.368)
  uStrip1 w0.102: v3(52.949,2.368) 52.949,6.177 cw(c55.489,6.177) 53.693,7.973 54.706,8.986 ccw(c53.405,10.287) 55.245,10.287 55.245,11.25 cw(c55.679,11.25) v1(55.372,11.557)
  Slow_Ctrl w0.137: v3(42.131,4.81) 42.621,4.81 cw(c42.621,3.421) 43.603,4.403 44.577,3.429 ccw(c46.11,4.962) 46.11,2.794 52.523,2.794 cw(c52.523,2.368) v3(52.949,2.368)
VADJ: C66.2 C106.2 IC8.1 IC8.2 IC8.14 J4.E39 J4.F40 J4.G39 J4.H40 RN1.5 RN1.6 RN1.7 RN1.8 TP8.1 U3.1 | length 20.2
  Top Layer w0.203: RN1.5@33.567,-1.873 RN1.6@33.967,-1.873 RN1.7@34.367,-1.873 RN1.8@34.767,-1.873 ; C106.2@51.678,-0.761 v3(52.324,-0.762) ; v3@52.369,-0.762 U3.1@52.369,0.266
  Top Layer w0.254: IC8.2@34.467,6.109 34.467,6.576 cw(c34.8,6.576) v3(34.8,6.908) cw(c34.8,6.576) IC8.1@35.132,6.576 ; RN1.8@34.767,-1.873 ccw(c34.767,-1.523) 35.117,-1.523 IC8.14@35.117,0.233 35.215,-0.378 35.957,-0.468 35.982,-0.471 35.986,-0.495 v3(35.989,-0.508) 37.784,-0.508 cw(c37.784,-0.761) v3(38.036,-0.761) ; TP8.1@64.85,6.794 cw(c64.85,5.807) 65.838,5.807 v3(65.838,5.53)
  Slow_Ctrl w0.254: v3(34.8,6.908) 34.8,0.681 ccw(c35.989,0.681) v3(35.989,-0.508)
  other v3: 62.028,4.26 64.568,4.26 63.298,5.53
VccR0: C45.2 C46.2 J2.15 L2.1 R29.2 R32.2 R35.2 | length 21
  Top Layer w0.117: R35.2@21.354,34.487 R32.2@21.354,35.535
  Slow_Ctrl w0.137: v3(3.407,33.322) cw(c5.878,33.322) 5.878,35.794 14.786,35.794 cw(c14.786,33.702) 16.877,33.702 ccw(c17.932,33.702) 17.932,32.648 v4@20.188,32.648
  other v3: 27.842,32.515
  other v4: 28.442,32.515 29.042,32.515 20.152,32.658 20.752,32.658 27.842,33.115 28.442,33.115 20.152,33.258 20.752,33.258 20.152,33.858 20.752,33.858
VccR1: C51.2 C52.2 J3.15 L4.1 R37.2 R40.2 R43.2 | length 18.4
  Top Layer w0.117: R43.2@21.354,20.237 R40.2@21.354,21.285
  Slow_Ctrl w0.137: v3(3.407,19.072) 11.255,19.072 ccw(c11.255,19.785) 11.759,19.281 cw(c12.434,18.606) 12.434,19.561 12.533,19.561 cw(c12.533,18.735) 13.117,19.319 13.78,18.656 ccw(c14.402,19.277) 14.402,18.398 v4@20.188,18.398
  other v3: 27.842,18.265
  other v4: 28.442,18.265 29.042,18.265 20.152,18.41 20.752,18.41 27.842,18.865 28.442,18.865 20.152,19.01 20.752,19.01 20.152,19.61 20.752,19.61
VccT0: C48.2 C49.2 J2.16 L3.1 R28.2 R30.2 R31.2 | length 13.9
  Top Layer w0.117: R30.2@21.354,28.818 R31.2@21.354,29.738
  Slow_Ctrl w0.137: v3(7.68,32.723) ccw(c8.288,32.723) 8.288,32.115 12.569,32.115 cw(c12.569,31.099) 13.287,31.817 ccw(c13.856,32.386) 13.856,31.582 v4@20.188,31.582
  other v3: 27.842,31.715
  other v4: 20.154,30.372 20.754,30.372 20.154,30.972 20.754,30.972 27.842,31.115 28.442,31.115 20.154,31.572 20.754,31.572 28.442,31.715 29.042,31.715
VccT1: C54.2 C55.2 J3.16 L5.1 R36.2 R38.2 R39.2 | length 13.9
  Top Layer w0.117: R38.2@21.354,14.568 R39.2@21.354,15.488
  Slow_Ctrl w0.137: v3(7.68,18.473) ccw(c8.288,18.473) 8.288,17.865 13.07,17.865 cw(c13.07,17.479) 13.343,17.752 13.551,17.544 ccw(c14.064,18.058) 14.064,17.332 v4@20.188,17.332
  other v3: 27.842,17.465
  other v4: 20.154,16.125 20.754,16.125 20.154,16.725 20.754,16.725 27.842,16.865 28.442,16.865 20.154,17.325 20.754,17.325 28.442,17.465 29.042,17.465
VREFAC: C13_l0.2 C13_l1.2 C13_l2.2 C13_l3.2 IC1_l0.5 IC1_l0.8 IC1_l0.14 IC1_l1.5 IC1_l1.8 IC1_l1.14 IC1_l2.5 IC1_l2.8 IC1_l2.14 IC1_l3.5 IC1_l3.8 IC1_l3.14 R20.1 R23.2
  other v3: 44.978,10.998 43.666,14.619 45.79,14.619 44.978,21.588 43.666,25.208 45.79,25.208 44.978,32.902 43.666,36.522 45.79,36.522 44.332,38.467 44.951,38.467 44.979,41.725 43.667,45.345 45.791,45.345
XTAL_GND: IC9.7 IC9.10 Q9.2 Q9.4 | length 2.9
  Top Layer w0.508: Q9.2@13.846,46.955 14.175,46.684 15.766,45.376 Q9.4@16.1,45.101
  other v4: 14.408,43.6 15.008,43.6 15.608,43.6 16.208,43.6 16.808,43.6 13.13,44.072 13.95,44.072 12.688,44.497 12.688,45.097 12.688,45.697 12.688,46.297 12.688,46.897 18.129,47.119 12.688,47.497 17.697,47.552 13.064,47.984 13.664,47.984 14.264,47.984 14.864,47.984 15.464,47.984 16.064,47.984 16.664,47.984 17.264,47.984
pads on no net: FTG1.FTG2 FTG2.FTG2 FTG3.FTG2 FTG4.FTG2 IC2_l0.6 IC2_l0.7 IC2_l0.14 IC2_l0.15 IC2_l1.6 IC2_l1.7 IC2_l1.14 IC2_l1.15 IC2_l2.6 IC2_l2.7 IC2_l2.14 IC2_l2.15 IC2_l3.6 IC2_l3.7 IC2_l3.14 IC2_l3.15 IC9.5 IC9.11 IC9.12 IC9.14 IC9.15 IC9.20 IC9.21 IC9.22 IC9.23 IC9.24 IC9.25 IC9.39 IC9.43 IC9.44 IC9.45 IC9.48 IC9.55 IC9.56 IC10.26 IC10.27 IC10.28 J2.7 J2.9 J2.MTG1 J2.MTG2 J3.7 J3.9 J3.MTG1 J3.MTG2 J4. J4._1 J4.A6 J4.A7 J4.A10 J4.A11 J4.A14 J4.A15 J4.A18 J4.A19 J4.A26 J4.A27 J4.A30 J4.A31 J4.A34 J4.A35 J4.A38 J4.A39 J4.B1 J4.B4 J4.B5 J4.B8 J4.B9 J4.B12 J4.B13 J4.B16 J4.B17 J4.B24 J4.B25 J4.B28 J4.B29 J4.B32 J4.B33 J4.B36 J4.B37 J4.B40 J4.C10 J4.C11 J4.C14 J4.C15 J4.C18 J4.C19 J4.C22 J4.C23 J4.C26 J4.C27 J4.D1 J4.D14 J4.D15 J4.D17 J4.D18 J4.D20 J4.D21 J4.D27 J4.D29 J4.D33 J4.D34 J4.E2 J4.E3 J4.E6 J4.E7 J4.E9 J4.E10 J4.E12 J4.E13 J4.E15 J4.E16 J4.E18 J4.E19 J4.E21 J4.E22 J4.E24 J4.E25 J4.E27 J4.E28 J4.E30 J4.E31 J4.E33 J4.E34 J4.E36 J4.E37 J4.F1 J4.F4 J4.F5 J4.F7 J4.F8 J4.F10 J4.F11 J4.F13 J4.F14 J4.F16 J4.F17 J4.F19 J4.F20 J4.F22 J4.F23 J4.F25 J4.F26 J4.F28 J4.F29 J4.F31 J4.F32 J4.F34 J4.F35 J4.F37 J4.F38 J4.G2 J4.G3 J4.G19 J4.G21 J4.G22 J4.G24 J4.G25 J4.G27 J4.G28 J4.G30 J4.G31 J4.G33 J4.G34 J4.G36 J4.G37 J4.H1 J4.H2 J4.H16 J4.H17 J4.H22 J4.H23 J4.H28 J4.H29 J4.H31 J4.H32 J4.H34 J4.H35 J4.H37 J4.H38 J4.I2 J4.I3 J4.I6 J4.I7 J4.I9 J4.I10 J4.I12 J4.I13 J4.I15 J4.I16 J4.I18 J4.I19 J4.I21 J4.I22 J4.I24 J4.I25 J4.I27 J4.I28 J4.I30 J4.I31 J4.I33 J4.I34 J4.I36 J4.I37 J4.I39 J4.J1 J4.J4 J4.J5 J4.J7 J4.J8 J4.J10 J4.J11 J4.J13 J4.J14 J4.J16 J4.J17 J4.J19 J4.J20 J4.J22 J4.J23 J4.J25 J4.J26 J4.J28 J4.J29 J4.J31 J4.J32 J4.J34 J4.J35 J4.J37 J4.J38 J4.J40 RN1.1 U2.7

## Polygon pours and split planes (outlines as drawn)
GND on Top Layer "GND_TOP_LAYER_P712" (solid, remove dead copper, pour order 712): -5.8,63.5 73,63.5 73,-5.5 -5.8,-5.5
1V8 on Top Layer "1V8_TOP_LAYER_P711" (solid, remove dead copper, pour order 711): 45.423,11.719 46.049,11.719 46.145,11.749 46.145,12.076 47.345,12.076 47.345,11.749 47.008,10.74 46.672,10.74 45.423,11.585
1V8 on Top Layer "1V8_TOP_LAYER_P710" (solid, remove dead copper, pour order 710): 45.423,22.318 46.049,22.318 46.145,22.348 46.145,22.676 47.345,22.676 47.345,22.348 47.008,21.34 46.672,21.34 45.423,22.185
1V8 on Top Layer "1V8_TOP_LAYER_P709" (solid, remove dead copper, pour order 709): 45.423,33.618 46.049,33.618 46.145,33.648 46.145,33.976 47.345,33.976 47.345,33.648 47.008,32.64 46.672,32.64 45.423,33.484
1V8 on Top Layer "1V8_TOP_LAYER_P667" (solid, remove dead copper, pour order 667): 45.424,42.45 46.051,42.45 46.147,42.48 46.147,42.807 47.347,42.807 47.347,42.48 47.01,41.471 46.673,41.471 45.424,42.316
P12V on Top Layer "P12V_TOP_LAYER_P653" (solid, remove dead copper, pour order 653): 24.394,-0.805 20.839,-0.805 20.834,-2.164 20.839,-4.614 24.394,-4.614
P2V05 on Top Layer "P2V05_TOP_LAYER_P708" (solid, remove dead copper, pour order 708): 2.164,24.76 2.164,28.716 5.047,28.716 5.047,24.76
P3V3 on Top Layer "P3V3_TOP_LAYER_P706" (solid, remove dead copper, pour order 706): 8.289,23.072 8.047,23.515 6.297,23.515 6.297,20.585 8.909,20.585 8.909,23.072
P3V3A on Top Layer "P3V3A_TOP_LAYER_P707" (solid, remove dead copper, pour order 707): 64.74,14.843 67.997,14.843 67.997,13.428 64.74,13.428
NetC22_1 on Top Layer "NETC22_1_TOP_LAYER_P654" (solid, remove dead copper, pour order 654): 20.839,-0.7 24.782,-0.7 24.782,2.227 22.394,2.227 21.607,-0.134 20.839,-0.134
P3V6 on Top Layer "P3V6_TOP_LAYER_P704" (solid, remove dead copper, pour order 704): 5.284,57.121 2.018,57.121 2.018,54.23 5.284,54.23
P2V05 on Top Layer "P2V05_TOP_LAYER_P702" (solid, remove dead copper, pour order 702): 1.358,44.078 -1.908,44.078 -1.908,41.187 1.358,41.187
P3V6 on Top Layer "P3V6_TOP_LAYER_P656" (solid, remove dead copper, pour order 656): -1.782,50.633 -5.048,50.633 -5.048,47.742 -1.782,47.742
3V3APLL on Top Layer "3V3APLL_TOP_LAYER_P699" (solid, remove dead copper, pour order 699): 0.318,51.137 1.118,51.137 4.31,51.137 4.31,48.832 0.318,48.832
3V3PS on Top Layer "3V3PS_TOP_LAYER_P697" (solid, remove dead copper, pour order 697): 7.351,57.599 8.151,57.599 11.343,57.599 11.343,55.294 7.351,55.294
1V8 on Top Layer "1V8_TOP_LAYER_P695" (solid, remove dead copper, pour order 695): 3.458,44.582 4.258,44.582 7.45,44.582 7.45,42.277 3.458,42.277
VccT1 on Top Layer "VCCT1_TOP_LAYER_P678" (solid, remove dead copper, pour order 678): 15.485,14.391 17.931,14.391 18.753,15.265 21.589,15.265 21.589,17.594 15.485,17.594
P3V3 on Top Layer "P3V3_TOP_LAYER_P662" (solid, remove dead copper, pour order 662): 15.485,17.588 11.903,17.588 11.904,14.384 15.485,14.384
VccR1 on Top Layer "VCCR1_TOP_LAYER_P676" (solid, remove dead copper, pour order 676): 15.293,21.344 17.738,21.344 18.753,20.464 21.397,20.464 21.397,18.14 15.293,18.14
P3V3 on Top Layer "P3V3_TOP_LAYER_P661" (solid, remove dead copper, pour order 661): 15.485,21.342 11.903,21.342 11.904,18.138 15.485,18.138
VccT0 on Top Layer "VCCT0_TOP_LAYER_P660" (solid, remove dead copper, pour order 660): 15.485,28.638 17.931,28.638 18.753,29.513 21.589,29.513 21.589,31.842 15.485,31.842
P3V3 on Top Layer "P3V3_TOP_LAYER_P658" (solid, remove dead copper, pour order 658): 15.485,31.838 11.903,31.838 11.904,28.634 15.485,28.634
VccR0 on Top Layer "VCCR0_TOP_LAYER_P659" (solid, remove dead copper, pour order 659): 15.293,35.592 17.738,35.592 18.753,34.712 21.397,34.712 21.397,32.388 15.293,32.388
P3V3 on Top Layer "P3V3_TOP_LAYER_P657" (solid, remove dead copper, pour order 657): 15.485,35.592 11.903,35.592 11.904,32.388 15.485,32.388
P3V6 on Top Layer "P3V6_TOP_LAYER_P655" (solid, remove dead copper, pour order 655): 24.782,2.227 24.782,6.359 21.074,6.359 21.074,2.916 21.361,2.68 21.361,2.23
VREFAC on Top Layer "VREFAC_TOP_LAYER_P690" (solid, remove dead copper, pour order 690): 43.666,14.803 43.666,14.369 45.798,14.369 45.798,14.803
1V8 on Top Layer "1V8_TOP_LAYER_P687" (solid, remove dead copper, pour order 687): 42.857,14.22 43.519,14.22 43.519,11.668 43.863,11.668 43.863,11.155 43.519,11.155 42.857,11.155
VREFAC on Top Layer "VREFAC_TOP_LAYER_P685" (solid, remove dead copper, pour order 685): 43.666,25.393 43.666,24.959 45.798,24.959 45.798,25.393
1V8 on Top Layer "1V8_TOP_LAYER_P683" (solid, remove dead copper, pour order 683): 42.857,24.81 43.519,24.81 43.519,22.258 43.863,22.258 43.863,21.745 43.519,21.745 42.857,21.745
VREFAC on Top Layer "VREFAC_TOP_LAYER_P682" (solid, remove dead copper, pour order 682): 43.666,36.707 43.666,36.273 45.798,36.273 45.798,36.707
1V8 on Top Layer "1V8_TOP_LAYER_P680" (solid, remove dead copper, pour order 680): 42.857,36.124 43.519,36.124 43.519,33.572 43.863,33.572 43.863,33.059 43.519,33.059 42.857,33.059
VREFAC on Top Layer "VREFAC_TOP_LAYER_P670" (solid, remove dead copper, pour order 670): 43.667,45.53 43.667,45.096 45.8,45.096 45.8,45.53
3V3PS on Top Layer "3V3PS_TOP_LAYER_P674" (solid, remove dead copper, pour order 674): 47.229,6.163 47.229,5.363 49.758,5.363 49.758,6.163
1V8 on Top Layer "1V8_TOP_LAYER_P665" (solid, remove dead copper, pour order 665): 42.859,44.947 43.52,44.947 43.52,42.395 43.865,42.395 43.864,41.882 43.52,41.882 42.859,41.882
XTAL_GND on Top Layer "XTAL_GND_TOP_LAYER_P664" (solid, remove dead copper, pour order 664): 19.533,45.13 19.533,45.43 18.483,45.43 16.909,43.856 14.713,43.856 14.242,44.326 12.942,44.326 12.942,43.818 13.51,43.594 14.205,43.348 16.901,43.348 18.683,45.13
XTAL_GND on Top Layer "XTAL_GND_TOP_LAYER_P663" (solid, remove dead copper, pour order 663): 17 vertices, not listed, extent 12.434,43.818 19.533,48.238
GND on Bottom Layer "GND_BOTTOM_LAYER_P705" (solid, remove dead copper, pour order 705): 73,63.5 -5.8,63.5 -5.8,-5.5 73,-5.5
1V8 on Bottom Layer "1V8_BOTTOM_LAYER_P703" (solid, remove dead copper, pour order 703): 45.329,42.509 45.854,43.034 46.6,43.034 47.249,42.384 47.042,41.47 46.826,41.47 45.329,41.762
1V8 on Bottom Layer "1V8_BOTTOM_LAYER_P701" (solid, remove dead copper, pour order 701): 45.328,33.686 45.853,34.211 46.599,34.211 47.248,33.561 47.041,32.647 46.824,32.647 45.328,32.939
1V8 on Bottom Layer "1V8_BOTTOM_LAYER_P700" (solid, remove dead copper, pour order 700): 45.328,22.372 45.853,22.897 46.599,22.897 47.248,22.247 47.041,21.333 46.824,21.333 45.328,21.625
VccR1 on Bottom Layer "VCCR1_BOTTOM_LAYER_P698" (solid, remove dead copper, pour order 698): 27.578,18.015 31.371,18.015 31.371,18.512 29.32,18.512 28.571,19.112 27.578,19.112
VccT1 on Bottom Layer "VCCT1_BOTTOM_LAYER_P696" (solid, remove dead copper, pour order 696): 27.578,17.715 31.371,17.715 31.371,17.218 29.32,17.218 28.571,16.618 27.578,16.618
VccR0 on Bottom Layer "VCCR0_BOTTOM_LAYER_P694" (solid, remove dead copper, pour order 694): 27.578,32.265 31.371,32.265 31.371,32.762 29.32,32.762 28.571,33.362 27.578,33.362
VccT0 on Bottom Layer "VCCT0_BOTTOM_LAYER_P693" (solid, remove dead copper, pour order 693): 27.578,31.965 31.371,31.965 31.371,31.468 29.32,31.468 28.571,30.868 27.578,30.868
1V8 on Bottom Layer "1V8_BOTTOM_LAYER_P679" (solid, remove dead copper, pour order 679): 37.094,41.364 37.094,42.058 34.941,42.058 34.941,41.064 36.124,41.064 36.124,41.264
1V8 on Bottom Layer "1V8_BOTTOM_LAYER_P673" (solid, remove dead copper, pour order 673): 37.093,32.54 37.093,33.234 34.94,33.234 34.94,32.24 36.123,32.24 36.123,32.44
1V8 on Bottom Layer "1V8_BOTTOM_LAYER_P675" (solid, remove dead copper, pour order 675): 39.343,32.54 39.343,33.234 41.495,33.234 41.495,32.24 40.313,32.24 40.313,32.44
1V8 on Bottom Layer "1V8_BOTTOM_LAYER_P669" (solid, remove dead copper, pour order 669): 39.343,21.226 39.343,21.92 41.495,21.92 41.495,20.926 40.313,20.926 40.313,21.126
1V8 on Bottom Layer "1V8_BOTTOM_LAYER_P668" (solid, remove dead copper, pour order 668): 39.343,10.639 39.343,11.333 41.495,11.333 41.495,10.339 40.313,10.339 40.313,10.539
1V8 on Bottom Layer "1V8_BOTTOM_LAYER_P688" (solid, remove dead copper, pour order 688): 45.328,11.782 45.853,12.307 46.599,12.307 47.248,11.657 47.041,10.743 46.824,10.743 45.328,11.035
1V8 on Bottom Layer "1V8_BOTTOM_LAYER_P689" (solid, remove dead copper, pour order 689): 42.853,12.307 42.853,11.032 44.628,11.032 44.628,11.782 43.828,11.782 43.603,11.782 43.603,12.007 43.603,12.307
1V8 on Bottom Layer "1V8_BOTTOM_LAYER_P686" (solid, remove dead copper, pour order 686): 42.853,22.897 42.853,21.622 44.628,21.622 44.628,22.372 43.828,22.372 43.603,22.372 43.603,22.597 43.603,22.897
1V8 on Bottom Layer "1V8_BOTTOM_LAYER_P684" (solid, remove dead copper, pour order 684): 42.853,34.211 42.853,32.936 44.628,32.936 44.628,33.686 43.828,33.686 43.603,33.686 43.603,33.911 43.603,34.211
1V8 on Bottom Layer "1V8_BOTTOM_LAYER_P681" (solid, remove dead copper, pour order 681): 42.854,43.034 42.854,41.759 44.629,41.759 44.629,42.509 43.829,42.509 43.604,42.509 43.604,42.734 43.604,43.034
1V8 on Bottom Layer "1V8_BOTTOM_LAYER_P677" (solid, remove dead copper, pour order 677): 39.344,41.364 39.344,42.058 41.496,42.058 41.496,41.064 40.314,41.064 40.314,41.264
1V8 on Bottom Layer "1V8_BOTTOM_LAYER_P672" (solid, remove dead copper, pour order 672): 37.093,21.226 37.093,21.92 34.94,21.92 34.94,20.926 36.123,20.926 36.123,21.126
1V8 on Bottom Layer "1V8_BOTTOM_LAYER_P652" (solid, remove dead copper, pour order 652): 37.093,10.639 37.093,11.333 34.94,11.333 34.94,10.339 36.123,10.339 36.123,10.539
GND on Clocks "GND_CLOCKS_P666" (solid, remove dead copper, pour order 666): 73,63.5 -5.8,63.5 -5.8,-5.5 73,-5.5
GND on uStrip1 "GND_USTRIP1_P671" (solid, remove dead copper, pour order 671): 73,63.5 -5.8,63.5 -5.8,-5.5 72.878,-5.5
GND on Slow_Ctrl "GND_SLOW_CTRL_P691" (solid, remove dead copper, pour order 691): -5.8,63.5 73,63.5 73,-5.5 -5.8,-5.5
GND on uStrip2 "GND_USTRIP2_P692" (solid, remove dead copper, pour order 692): -5.8,63.5 73,63.5 73,-5.5 -5.8,-5.5
no net on GND_12 (split plane): -5.794,-1.798 -5.776,-1.857 -5.8,-1.799 -5.8,-1.738
no net on GND_12 (split plane): -5.719,-1.98 -5.68,-2.027 -5.724,-1.983 -5.748,-1.926
no net on GND_12 (split plane): -5.794,58.398 -5.8,58.338 -5.8,58.399 -5.776,58.457
no net on GND_12 (split plane): -5.719,58.58 -5.748,58.526 -5.724,58.583 -5.68,58.627
no net on GND_12 (split plane): -5.58,-2.119 -5.526,-2.148 -5.583,-2.124 -5.627,-2.08
no net on GND_12 (split plane): -5.398,-2.194 -5.338,-2.2 -5.399,-2.2 -5.457,-2.176
GND on GND_12 (split plane): 143 vertices, not listed, extent -5.799,-5.499 72.999,63.499
no net on GND_12 (split plane): -5.58,58.719 -5.627,58.68 -5.583,58.724 -5.526,58.748
no net on GND_12 (split plane): -5.338,58.8 -5.398,58.794 -5.457,58.776 -5.399,58.8
no net on GND_12 (split plane): 0.191,58.839 0.111,58.815 0.265,58.879
no net on GND_12 (split plane): 0.353,58.947 0.288,58.894 0.406,59.012
no net on GND_12 (split plane): 0.461,59.109 0.421,59.035 0.485,59.189
no net on GND_12 (split plane): 0.506,60.498 0.5,60.438 0.5,60.499 0.524,60.557
no net on GND_12 (split plane): 0.581,60.68 0.552,60.626 0.576,60.683 0.62,60.727
no net on GND_12 (split plane): 0.72,60.819 0.673,60.78 0.717,60.824 0.774,60.848
no net on GND_12 (split plane): 0.902,60.894 0.843,60.876 0.901,60.9 0.962,60.9
no net on GND_12 (split plane): 10.991,60.939 10.911,60.915 11.065,60.979
no net on GND_12 (split plane): 11.153,61.047 11.088,60.994 11.206,61.112
no net on GND_12 (split plane): 11.261,61.209 11.221,61.135 11.285,61.289
no net on GND_12 (split plane): 16.181,-5.28 16.22,-5.327 16.176,-5.283 16.152,-5.226
no net on GND_12 (split plane): 16.32,-5.419 16.374,-5.448 16.317,-5.424 16.273,-5.38
no net on GND_12 (split plane): 15.953,-2.347 16.006,-2.412 15.888,-2.294
no net on GND_12 (split plane): 16.106,-5.098 16.124,-5.157 16.1,-5.099 16.1,-5.038
no net on GND_12 (split plane): 16.061,-2.509 16.085,-2.589 16.021,-2.435
no net on GND_12 (split plane): 16.502,-5.494 16.562,-5.5 16.501,-5.5 16.443,-5.476
no net on GND_12 (split plane): 72.599,-5.5 72.538,-5.5 72.598,-5.494 72.657,-5.476
no net on GND_12 (split plane): 72.783,-5.424 72.726,-5.448 72.78,-5.419 72.827,-5.38
no net on GND_12 (split plane): 72.924,-5.283 72.88,-5.327 72.919,-5.28 72.948,-5.226
no net on GND_12 (split plane): 73,-5.099 72.976,-5.157 72.994,-5.098 73,-5.038
no net on GND_12 (split plane): 11.306,63.098 11.3,63.038 11.3,63.099 11.324,63.157
no net on GND_12 (split plane): 15.791,-2.239 15.865,-2.279 15.711,-2.215
no net on GND_12 (split plane): 11.381,63.28 11.352,63.226 11.376,63.283 11.42,63.327
no net on GND_12 (split plane): 11.52,63.419 11.473,63.38 11.517,63.424 11.574,63.448
no net on GND_12 (split plane): 11.702,63.494 11.643,63.476 11.701,63.5 11.762,63.5
XTAL_GND on GND_12 (split plane): 19.661,46.968 19.661,44.962 17.892,43.193 13.397,43.193 12.313,44.276 12.313,47.819 12.826,48.331 18.298,48.331
no net on GND_12 (split plane): 73,63.099 73,63.038 72.994,63.098 72.976,63.157
no net on GND_12 (split plane): 72.657,63.476 72.598,63.494 72.538,63.5 72.599,63.5
no net on GND_12 (split plane): 72.924,63.283 72.948,63.226 72.919,63.28 72.88,63.327
no net on GND_12 (split plane): 72.783,63.424 72.827,63.38 72.78,63.419 72.726,63.448
GND on GND_35 (split plane): -5.794,-1.798 -5.776,-1.857 -5.8,-1.799 -5.8,-1.738
GND on GND_35 (split plane): -5.719,-1.98 -5.68,-2.027 -5.724,-1.983 -5.748,-1.926
GND on GND_35 (split plane): -5.794,58.398 -5.8,58.338 -5.8,58.399 -5.776,58.457
GND on GND_35 (split plane): -5.719,58.58 -5.748,58.526 -5.724,58.583 -5.68,58.627
GND on GND_35 (split plane): -5.58,-2.119 -5.526,-2.148 -5.583,-2.124 -5.627,-2.08
GND on GND_35 (split plane): -5.398,-2.194 -5.338,-2.2 -5.399,-2.2 -5.457,-2.176
GND on GND_35 (split plane): 143 vertices, not listed, extent -5.799,-5.499 72.999,63.499
GND on GND_35 (split plane): -5.58,58.719 -5.627,58.68 -5.583,58.724 -5.526,58.748
GND on GND_35 (split plane): -5.338,58.8 -5.398,58.794 -5.457,58.776 -5.399,58.8
GND on GND_35 (split plane): 0.191,58.839 0.111,58.815 0.265,58.879
GND on GND_35 (split plane): 0.353,58.947 0.288,58.894 0.406,59.012
GND on GND_35 (split plane): 0.461,59.109 0.421,59.035 0.485,59.189
GND on GND_35 (split plane): 0.506,60.498 0.5,60.438 0.5,60.499 0.524,60.557
GND on GND_35 (split plane): 0.581,60.68 0.552,60.626 0.576,60.683 0.62,60.727
GND on GND_35 (split plane): 0.72,60.819 0.673,60.78 0.717,60.824 0.774,60.848
GND on GND_35 (split plane): 0.902,60.894 0.843,60.876 0.901,60.9 0.962,60.9
GND on GND_35 (split plane): 10.991,60.939 10.911,60.915 11.065,60.979
GND on GND_35 (split plane): 11.153,61.047 11.088,60.994 11.206,61.112
GND on GND_35 (split plane): 11.261,61.209 11.221,61.135 11.285,61.289
GND on GND_35 (split plane): 16.181,-5.28 16.22,-5.327 16.176,-5.283 16.152,-5.226
GND on GND_35 (split plane): 16.32,-5.419 16.374,-5.448 16.317,-5.424 16.273,-5.38
GND on GND_35 (split plane): 16.061,-2.509 16.085,-2.589 16.021,-2.435
GND on GND_35 (split plane): 16.106,-5.098 16.124,-5.157 16.1,-5.099 16.1,-5.038
GND on GND_35 (split plane): 16.502,-5.494 16.562,-5.5 16.501,-5.5 16.443,-5.476
GND on GND_35 (split plane): 72.599,-5.5 72.538,-5.5 72.598,-5.494 72.657,-5.476
GND on GND_35 (split plane): 72.783,-5.424 72.726,-5.448 72.78,-5.419 72.827,-5.38
GND on GND_35 (split plane): 72.924,-5.283 72.88,-5.327 72.919,-5.28 72.948,-5.226
GND on GND_35 (split plane): 73,-5.099 72.976,-5.157 72.994,-5.098 73,-5.038
GND on GND_35 (split plane): 11.306,63.098 11.3,63.038 11.3,63.099 11.324,63.157
GND on GND_35 (split plane): 15.791,-2.239 15.865,-2.279 15.711,-2.215
GND on GND_35 (split plane): 11.381,63.28 11.352,63.226 11.376,63.283 11.42,63.327
GND on GND_35 (split plane): 11.52,63.419 11.473,63.38 11.517,63.424 11.574,63.448
GND on GND_35 (split plane): 11.702,63.494 11.643,63.476 11.701,63.5 11.762,63.5
GND on GND_35 (split plane): 15.953,-2.347 16.006,-2.412 15.888,-2.294
GND on GND_35 (split plane): 73,63.099 73,63.038 72.994,63.098 72.976,63.157
GND on GND_35 (split plane): 72.657,63.476 72.598,63.494 72.538,63.5 72.599,63.5
GND on GND_35 (split plane): 72.924,63.283 72.948,63.226 72.919,63.28 72.88,63.327
GND on GND_35 (split plane): 72.783,63.424 72.827,63.38 72.78,63.419 72.726,63.448
P3V3 on GND_57 (split plane): -5.794,-1.798 -5.776,-1.857 -5.8,-1.799 -5.8,-1.738
P3V3 on GND_57 (split plane): -5.719,-1.98 -5.68,-2.027 -5.724,-1.983 -5.748,-1.926
P3V3 on GND_57 (split plane): -5.794,58.398 -5.8,58.338 -5.8,58.399 -5.776,58.457
P3V3 on GND_57 (split plane): -5.719,58.58 -5.748,58.526 -5.724,58.583 -5.68,58.627
P3V3 on GND_57 (split plane): -5.58,-2.119 -5.526,-2.148 -5.583,-2.124 -5.627,-2.08
P3V3 on GND_57 (split plane): -5.398,-2.194 -5.338,-2.2 -5.399,-2.2 -5.457,-2.176
GND on GND_57 (split plane): 143 vertices, not listed, extent -5.799,-5.499 72.999,63.499